# Altium PCB OFP_MCM_v1.6.3.PcbDoc (part 7 of 8)
Units mil, origin at the board's own origin, x right, y up, seen from the top; angles counter-clockwise.
Board outline 4330.71 x 4724.41 mil, 4 copper layers (Top Layer, Layer 1, Layer 2, Bottom Layer), stack 62.047 mil thick; 385 components, 287 nets, 1341 pads, 554 vias.
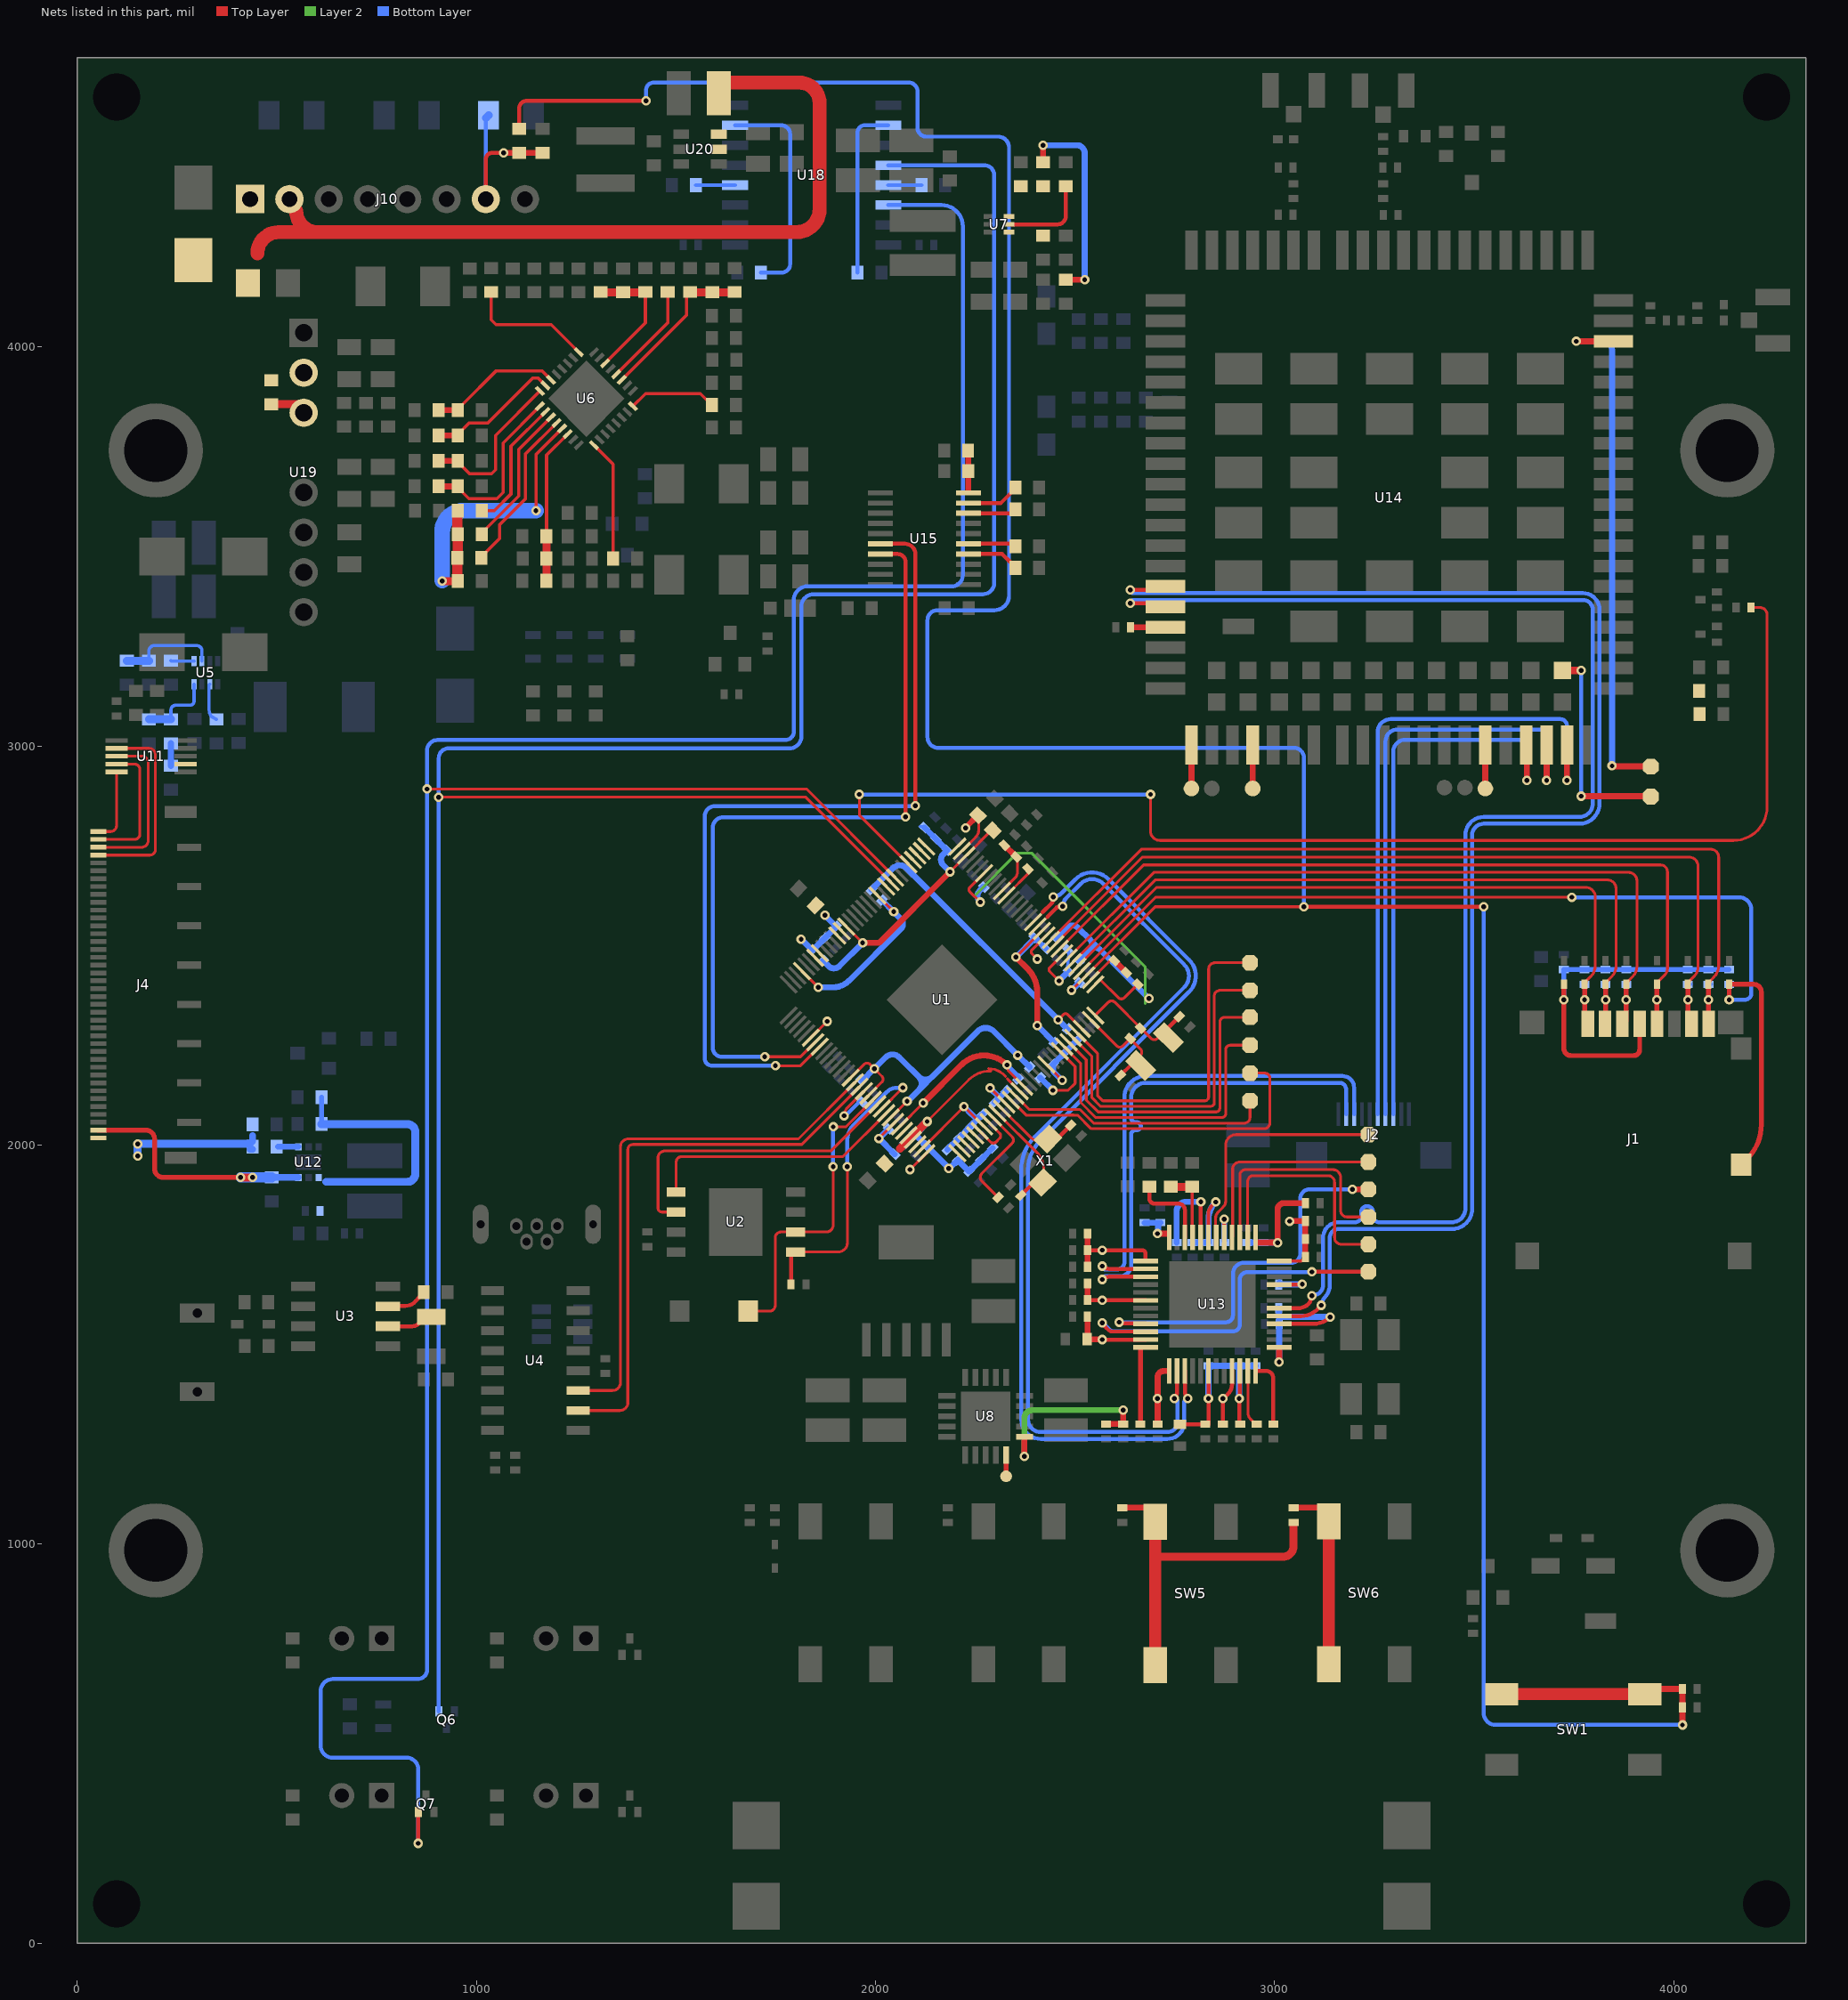
[diagram p6: the nets of this part, all layers, seen from the top]

## Via types
v1: diameter 23.62, hole 11.81, Top Layer to Bottom Layer, tented both sides, 554 vias

## Nets (pads, with @x,y where several pads share a name; then routed paths per layer and width w, separated by ;. In a path a pad name is that pad's centre, name@x,y a point inside that pad or via, vN(x,y) a via of type N, cw(c..) or ccw(c..) an arc to the next point about the centre after c; other vN are vias at no path point) (continued)
NetR15_2: R15.2 R16.2 SW5.3 SW5.4 | length 879.3
  Top Layer w10: 2701.1,984.48 2701.1,984.6
  Top Layer w15: R15.2@2618.11,1091.45 2679.07,1091.45 SW5.3@2701.1,1055.52
  Top Layer w20: 2701.1,968 3019.19,968 ccw(c3019.19,996.05) 3047.24,996.05 R16.2@3047.24,1051.82
  Top Layer w30: SW5.4@2701.1,697.26 2701.1,968 2701.1,984.48 ; 2701.1,984.6 SW5.3@2701.1,1055.52
NetR16_1: R16.1 SW6.3 SW6.4 | length 466.7
  Top Layer w15: R16.1@3047.24,1091.45 3111.3,1091.45 3135.82,1066.92 SW6.3@3135.82,1057.17
  Top Layer w30: SW6.4@3135.82,698.91 SW6.3@3135.82,1057.17
NetR20_2: R20.2 U3.3 | length 103.5
  Top Layer w10: U3.3@778.35,1595.92 803.87,1596.79 821.8,1596.79 ccw(c821.8,1631.46) 847.83,1608.55 858.04,1620.12 R20.2@868.04,1631.46
NetR39_1: R39.1 U5.6 | length 97.5
  Bottom Layer w8: U5.6@332.13,3154.42 330.44,3152.73 330.44,3097.47 330.44,3089.88 ccw(c356.95,3089.88) 335.48,3074.33 R39.1@348.98,3066.51
NetR40_2: R40.2 R43.1 U5.2 | length 253.6
  Bottom Layer w8: R43.1@179.63,3213.36 179.63,3238.1 cw(c192.83,3238.1) 192.83,3251.3 299.43,3251.3 cw(c299.43,3238.29) 312.44,3238.29 U5.2@312.44,3212.29
  Bottom Layer w20: R40.2@124.51,3213.36 R43.1@179.63,3213.36
NetR41_1: R41.1 R46.1 | length 56.5
  Bottom Layer w15: R41.1@234.74,2950 R46.1@234.74,3006.51
NetR42_1: R42.1 U6.25 | length 322.7
  Top Layer w8: R42.1@1037.22,4137.36 1037.22,4067.4 1048.9,4055.71 1187.4,4055.71 U6.25@1256.52,3986.59
NetR44_2: R44.2 R46.2 U5.8 | length 191.5
  Bottom Layer w8: R46.2@234.74,3066.51 234.74,3089.99 cw(c246.42,3089.99) 246.42,3101.67 282.21,3101.67 ccw(c282.21,3112.22) 292.76,3112.22 U5.8@292.76,3154.42
  Bottom Layer w20: R44.2@179.63,3066.51 R46.2@234.74,3066.51
NetR45_2: R45.2 U5.1 | length 58.5
  Bottom Layer w8: R45.2@234.74,3213.36 235.81,3212.29 U5.1@292.76,3212.29
NetR50_2: R50.2 U6.3 | length 364.6
  Top Layer w8: R50.2@1013.38,3530.5 1024.38,3541.5 1024.38,3544.46 1106.3,3626.39 1106.3,3742.55 U6.3@1186.92,3823.17
NetR51_2: R51.2 U6.2 | length 332.2
  Top Layer w8: R51.2@1013.38,3589.55 1045.07,3589.55 1086.61,3631.09 1086.61,3750.7 U6.2@1173,3837.09
NetR52_1: R52.1 U6.9 | length 304
  Top Layer w8: U6.9@1294.66,3753.58 1342.52,3705.72 R52.1@1342.52,3469.44
NetR55_2: R55.2 U6.4 | length 416
  Top Layer w8: R55.2@1012.38,3471.44 1012.38,3473.94 1023.38,3484.94 1023.58,3484.94 1058.63,3519.99 1058.63,3554.38 1123.12,3618.88 1123.12,3731.53 U6.4@1200.84,3809.25
NetR57_1: R57.1 U6.16 | length 223
  Top Layer w8: U6.16@1392.09,3851.01 1423.97,3882.89 1561.12,3882.89 R57.1@1589.92,3854.08
NetR58_1: R58.1 U7.4
NetR61_1: R61.1 R66.1 | length 523.7
  Top Layer w15: R66.1@2419.53,4461.94 v1(2419.53,4505) ; R61.1@2476.26,4168.04 v1@2524,4168.04
  Bottom Layer w15: v1(2419.53,4505) 2504,4505 cw(c2504,4485) 2524,4485 v1(2524,4168)
NetR62_2: R62.2 U7.5 | length 228.9
  Top Layer w10: U7.5@2334.12,4306.74 2456.57,4306.74 ccw(c2456.57,4326.42) 2476.26,4326.42 R62.2@2476.26,4401.94
NetR63_2: R63.2 R66.2 U7.6
NetR64_2: R64.2 U6.20 | length 259.9
  Top Layer w8: U6.20@1350.34,3930.91 1479.29,4059.86 R64.2@1479.29,4137.36
NetR67_1: R67.1 R68.2 U8.16 | length 477.7
  Top Layer w15: v1(2373.09,1220) U8.16@2373.09,1266.19 ; R67.1@2577.14,1301.08 R68.2@2620.14,1301.08 v1(2620.14,1335.58)
  Layer 2 w15: v1(2373.09,1220) 2373.09,1315.42 cw(c2393.25,1315.42) 2393.25,1335.58 v1(2620.14,1335.58)
NetR82_1: R82.1 R85.2 SB1.1 U12.1 | length 653.4
  Bottom Layer w12: R85.2@611.74,2052.48 SB1.1@611.74,2120
  Bottom Layer w20: R85.2@611.74,2052.48 826.79,2052.48 cw(c826.79,2032.49) 840.62,2046.92 841.23,2046.32 cw(c826.79,2032.49) 846.78,2032.49 846.78,1927 cw(c827.64,1927) 843.52,1916.31 838.33,1911.12 cw(c827.64,1927) 827.64,1907.86 623.74,1907.86
NetR84_1: R84.1 U12.4 | length 51.1
  Bottom Layer w15: R84.1@503.14,1995.63 U12.4@554.2,1995.63
NetR87_2: R87.2 U13.24 | length 203.1
  Top Layer w7: R87.2@2663,1301.08 R87.2@2664.16,1302.24 ; U13.24@2664.16,1490.38 2666.56,1492.78 U13.24@2676.46,1492.78
  Top Layer w12: R87.2@2664.16,1302.24 U13.24@2664.16,1490.38
NetR88_2: R88.2 R89.2 U13.9 | length 182.2
  Top Layer w7: R88.2@2793.18,1895.22 2793.18,1769.76 U13.9@2794.57,1768.37
  Top Layer w20: R89.2@2739.41,1895.22 R88.2@2794.19,1895.22
NetR90_2: R90.2 U13.35 | length 143.2
  Top Layer w7: U13.35@2932.37,1433.73 2933.23,1432.87 2933.23,1328.51 ccw(c2954.34,1328.51) 2939.41,1313.58 2945.98,1307.01 2945.98,1306.58 2951.48,1301.08 R90.2@2954.98,1301.08
NetR91_2: R91.2 U13.36 | length 169.4
  Top Layer w10: U13.36@2952.05,1433.73 2978.52,1433.73 cw(c2978.52,1415.66) 2996.59,1415.66 R91.2@2996.59,1301.08
NetR92_1: R92.1 U13.5 | length 99.3
  Top Layer w10: U13.5@2873.28,1768.41 v1@2873.28,1814.4
  Bottom Layer w15: R92.1@2873.23,1761.25 v1(2873.24,1814.43)
NetR94_1: R94.1 U13.8 | length 242.3
  Top Layer w10: U13.8@2814.26,1768.37 2814.6,1768.72 2814.6,1857.31 v1(2814.95,1857.65)
  Bottom Layer w15: R94.1@2754.41,1755.38 2754.41,1834.25 cw(c2777.82,1834.25) 2777.82,1857.65 v1(2814.95,1857.65)
NetR95_2: R95.2 U13.10 | length 203.2
  Top Layer w10: R95.2@2686,1895.22 2686,1866.4 ccw(c2699.4,1866.4) 2699.4,1853 2759,1853 cw(c2759,1837.11) 2774.89,1837.11 U13.10@2774.89,1768.37
NetR102_1: R102.1 R104.1 U15.10 | length 102.9
  Top Layer w15: U15.10@2232.11,3636.64 R104.1@2232.11,3688.34 R102.1@2232.11,3739.52
NetR105_2: R105.2 U15.4 | length 133.1
  Top Layer w10: U15.4@2232.67,3480.66 2317.32,3480.66 2339.46,3458.52 2340,3458.52 2350,3448.52 R105.2@2350,3446.02
NetR106_2: R106.2 U15.5 | length 117.4
  Top Layer w10: U15.5@2232.67,3506.25 2349.9,3506.25 R106.2@2350,3506.16
NetR107_2: R107.2 U15.8 | length 121.4
  Top Layer w10: U15.8@2232.67,3583.02 2340.2,3583.02 R107.2@2350,3592.82
NetR108_2: R108.2 U15.9 | length 134.7
  Top Layer w10: U15.9@2232.67,3608.61 2314.11,3608.61 2350,3644.5 R108.2@2350,3647
NetR110_2: R110.2 R111.1
NetR115_2: 
NetR123_2: R123.2 U18.7 | length 561
  Bottom Layer w10: U18.7@1648.07,4554.94 1763.45,4554.94 cw(c1763.45,4532.39) 1786,4532.39 1786,4207 cw(c1765.01,4207) 1765.01,4186.01 R123.2@1713.15,4186.01
NetR124_1: R124.1 U18.10 | length 438.2
  Bottom Layer w10: R124.1@1954.93,4186.01 1954.93,4536.95 cw(c1972.92,4536.95) 1972.92,4554.94 U18.10@2031.93,4554.94
NetR125_2: R125.2 U19.3 | length 93
  Top Layer w20: R125.2@486.21,3856.18 493.71,3856.18 553.27,3856.18 561.94,3847.51 U19.3@567.18,3834.86
NetR126_2: R126.2 U18.4 | length 98.2
  Bottom Layer w10: R126.2@1549.91,4404.94 U18.4@1648.07,4404.94
NetR127_1: R127.1 U18.13 | length 82.8
  Bottom Layer w10: U18.13@2031.93,4404.94 R127.1@2114.74,4404.94
NetTP1_1: TP1.1 U1.92 | length 899.2
  Top Layer w7: U1.92@2505.77,2280.02 2555.91,2229.88 2555.91,2124.11 2569.24,2110.78 2824.6,2110.78 ccw(c2824.6,2120.71) 2834.52,2120.71 2834.52,2440.93 cw(c2850.25,2440.93) 2850.25,2456.66 TP1.1@2938.06,2456.66
NetTP2_1: TP2.1 U1.91 | length 855.9
  Top Layer w7: U1.91@2494.63,2268.89 2541.91,2221.61 2541.91,2118.31 2563.44,2096.78 2839.89,2096.78 2844.42,2098.41 2847.66,2101.65 ccw(c2839.89,2105.41) 2848.52,2105.41 2848.52,2373.18 cw(c2862.9,2373.18) 2862.9,2387.56 TP2.1@2938.06,2387.56
NetTP3_1: TP3.1 U1.90 | length 814
  Top Layer w7: U1.90@2483.49,2257.75 2527.91,2213.34 2527.91,2112.51 2557.64,2082.78 2852.79,2082.78 ccw(c2852.79,2092.52) 2862.52,2092.52 2862.52,2307.86 cw(c2874.73,2307.86) 2874.73,2320.06 TP3.1@2938.06,2320.06
NetTP4_1: TP4.1 U1.89 | length 769.3
  Top Layer w7: U1.89@2472.36,2246.62 2472.36,2246 2513.91,2204.46 2513.91,2106.71 2551.84,2068.78 2867.29,2068.78 ccw(c2867.29,2078.68) 2877.19,2078.68 2877.19,2238.96 cw(c2888.29,2238.96) 2888.29,2250.06 TP4.1@2938.06,2250.06
NetTP5_1: TP5.1 U1.78 | length 667
  Top Layer w7: U1.78@2349.87,2124.13 2385.12,2088.88 2481.09,2088.88 2481.21,2089 2501.51,2089 2501.63,2088.88 2511.94,2088.88 2546.04,2054.78 2924.06,2054.78 ccw(c2924.06,2068.78) 2938.06,2068.78 TP5.1@2938.06,2110.78
NetTP6_1: TP6.1 U1.77 | length 856.3
  Top Layer w7: U1.77@2338.75,2113.01 2376.87,2074.88 2486.89,2074.88 2487.01,2075 2495.71,2075 2495.83,2074.88 2506.14,2074.88 2540.24,2040.78 2972.78,2040.78 ccw(c2972.78,2056) 2988,2056 2988,2167 ccw(c2974.94,2167) 2974.94,2180.06 TP6.1@2938.06,2180.06
NetTP7_1: TP7.1 U8.15 | length 53.2
  Top Layer w12: TP7.1@2327.09,1170 U8.15@2327.09,1223.23
NetTP8_1: TP8.1 U14.34 | length 1334.5
  Top Layer w15: v1(3755.66,4013.78) U14.34@3848.42,4013.78 ; v1(3845,2950) 3846.09,2948.91 3940.98,2948.91 TP8.1@3942.06,2947.83
  Bottom Layer w15: v1(3755.66,4013.78) 3823.16,4013.78 cw(c3823.16,3991.94) 3845,3991.94 v1(3845,2950)
NetTP9_1: TP9.1 U13.2 | length 608.8
  Top Layer w7: U13.2@2932.37,1768.37 2932.37,1909.45 cw(c2946.15,1909.45) 2946.15,1923.23 3133.07,1923.23 cw(c3133.07,1906.34) 3149.97,1906.34 3149.97,1768.25 ccw(c3167.13,1768.25) 3167.13,1751.09 TP9.1@3234.68,1751.09
NetTP10_1: TP10.1 U14.128 | length 536
  Top Layer w15: v1(3767.71,2873.92) 3940.99,2873.92 TP10.1@3942.06,2872.84
  Top Layer w20: U14.128@3720.47,3188.98 v1(3767.71,3188.98)
  Bottom Layer w10: v1@3767.71,2875 v1(3767.71,3188.98)
NetTP11_1: TP11.1 U13.3 | length 589.2
  Top Layer w7: U13.3@2912.68,1768.37 2912.68,1924.45 cw(c2926.46,1924.45) 2926.46,1938.23 3145.84,1938.23 cw(c3145.84,1919.11) 3164.97,1919.11 3164.97,1835.9 ccw(c3181.01,1835.9) 3181.01,1819.86 TP11.1@3234.68,1819.86
NetTP12_1: TP12.1 U13.22 | length 927.1
  Top Layer w9: v1(2567.73,1554.57) 2579.25,1540.42 ccw(c2596.64,1554.57) 2596.64,1532.15 U13.22@2676.46,1532.15
  Top Layer w10: v1@3093.07,1682.33 TP12.1@3234.68,1682.33
  Bottom Layer w10: v1@2567.73,1555.57 2585.88,1537.42 ccw(c2596.19,1547.74) 2596.19,1533.16 2895.69,1533.16 ccw(c2895.69,1549.75) 2912.29,1549.75 2912.29,1662.62 cw(c2931.02,1662.62) 2914.65,1671.73 cw(c2931.02,1662.62) 2931.02,1681.35 3092.27,1681.35 ccw(c3092.27,1682.15) v1(3093.07,1682.15)
NetTP13_1: TP13.1 U13.21 | length 986.6
  Top Layer w10: v1(2610,1555.97) 2613.69,1555.97 2616.94,1552.72 2675.58,1552.72 U13.21@2676.46,1551.84
  Top Layer w15: v1(3194.31,1888.63) TP13.1@3234.68,1888.63
  Bottom Layer w10: v1(2610,1555.97) 2878.03,1555.97 ccw(c2878.03,1573.22) 2895.29,1573.22 2895.29,1677.28 cw(c2922.85,1677.28) 2922.85,1704.84 3041.16,1704.84 ccw(c3041.16,1727.51) 3063.83,1727.51 3063.83,1865.51 cw(c3086.94,1865.51) 3086.94,1888.63 v1(3194.31,1888.63)
NetTP14_1: TP14.1 U13.4 | length 522.1
  Top Layer w7: U13.4@2893,1768.37 2894.55,1769.93 2894.55,1939.5 cw(c2912.44,1939.5) 2912.44,1957.39 TP14.1@3234.68,1957.39
NetTP15_1: TP15.1 U13.6 | length 613.3
  Top Layer w7: U13.6@2853.63,1768.37 2851.93,1770.07 2851.93,1816.46 cw(c2874.04,1816.46) 2858.4,1832.09 2870.55,1844.24 ccw(c2854.53,1860.26) 2877.19,1860.26 2877.19,2000.01 cw(c2903.33,2000.01) 2903.33,2026.16 TP15.1@3234.69,2026.16
NetU3_2: U3.2 X3.2 | length 115.1
  Top Layer w10: U3.2@778.35,1545.92 839.4,1545.92 ccw(c839.4,1569.53) 857.89,1554.84 X3.2@887.21,1569.53
NRST: D19.1 J10.7 R118.1 R119.1 | length 463.7
  Top Layer w10: J10.7@1023.62,4370.08 1023.62,4469.62 cw(c1040,4469.62) 1040,4486 v1(1068.44,4486)
  Top Layer w15: v1(1068.44,4486) R119.1@1107.25,4486 R118.1@1165.68,4486
  Bottom Layer w10: J10.7@1023.62,4370.08 D19.1@1023.62,4573.15
  Bottom Layer w20: D19.1@1023.62,4573.15 D19.1@1030.47,4580
PCA0: 
PCA1: 
PCA2: 
PCA3: 
PCA4: 
PCA5: 
PCA6: 
PCA7: 
PE20: U1.10
PENIRQ: U11.7
PG0: R117.2 U1.5 | length 3186.4
  Top Layer w7: v1(1959.44,2878.39) 1959.44,2826.35 U1.5@2082.63,2703.16 ; v1(2688.97,2878.39) 2688.97,2786.33 ccw(c2712.3,2786.33) 2712.36,2763 4149.58,2763 ccw(c4149.58,2846.83) 4233.42,2846.83 4233.42,3328.92 ccw(c4215.77,3328.92) 4215.77,3346.56 R117.2@4192.67,3346.56
  Bottom Layer w10: v1(1959.44,2878.39) v1(2688.97,2878.39)
PG1: U1.4
PG2: U1.3
PG3: U1.2
PG5: U1.128
RTC_VIO: C25.2 U1.97 | length 146.1
  Top Layer w7: U1.97@2550.32,2402.49 2562.18,2414.36 2562.8,2414.36 2607.88,2369.28 2607.93,2369.23 ccw(c2615.73,2377.03) 2623.54,2369.26 C25.2@2657.15,2402.86
SDC0-CLK0: D2.2 J1.5 U1.105 | length 2010.5
  Top Layer w7: U1.105@2461.22,2491.59 2671.37,2701.74 3966.26,2701.74 cw(c3966.26,2684.11) 3983.89,2684.11 3983.89,2442.16 cw(c3961.26,2442.16) 3977.27,2426.17 3957.58,2406.47 D2.2@3957.58,2402.53
  Top Layer w12: J1.5@3957.58,2303.35 v1(3957.58,2364.12) D2.2@3957.58,2402.53
SDC0-CMD: D3.2 J1.3 R2.1 U1.103 | length 1935.4
  Top Layer w7: U1.103@2483.49,2469.32 2697.24,2683.06 3885.92,2683.06 cw(c3885.92,2661.73) 3907.25,2661.73 3907.25,2446.8 cw(c3872.84,2446.8) 3897.18,2422.47 3881.18,2406.47 D3.2@3881.18,2402.53 D3.2@3880.18,2401.53 ; J1.3@3870.96,2303.35 J1.3@3880.18,2312.56
  Top Layer w12: J1.3@3880.18,2312.56 v1(3880.18,2364.12) D3.2@3880.18,2401.53
  Bottom Layer w8: R2.1@3880.18,2401.71 R2.1@3881.18,2402.71
  Bottom Layer w10: v1(3880.18,2364.12) R2.1@3880.18,2401.71
SDC0-D0: D4.2 J1.7 R3.1 U1.106 | length 2166
  Top Layer w7: U1.106@2450.09,2502.72 2668.79,2721.42 4037.58,2721.42 cw(c4037.58,2698.5) 4060.5,2698.5 4060.5,2447.1 cw(c4026.44,2447.1) 4050.52,2423.01 4033.98,2406.47 4033.98,2402.53 D4.2@4035.13,2401.39 ; J1.7@4035.13,2312.41 J1.7@4044.19,2303.35
  Top Layer w12: J1.7@4035.13,2312.41 v1(4035.13,2364.12) D4.2@4035.13,2401.39
  Bottom Layer w8: R3.1@4035.13,2397.71 4040.13,2402.71 R3.1@4042.52,2402.71
  Bottom Layer w10: v1(4035.13,2364.12) R3.1@4035.13,2397.71
SDC0-D1: D5.2 J1.8 R4.1 U1.107 | length 2249.4
  Top Layer w7: U1.107@2438.95,2513.86 2666.19,2741.11 4091.89,2741.11 cw(c4091.89,2720.73) 4112.27,2720.73 4112.27,2450.53 cw(c4068.2,2450.53) 4099.38,2419.4 ; J1.8@4086.45,2304.39 J1.8@4087.5,2303.35 ; D5.2@4086.45,2402.53 4086.45,2406.47 4099.36,2419.38
  Top Layer w12: J1.8@4086.45,2304.39 v1(4086.45,2364.12) D5.2@4086.45,2402.53
  Bottom Layer w8: R4.1@4086.45,2397.71 4091.45,2402.71 R4.1@4094.5,2402.71
  Bottom Layer w10: v1(4086.45,2364.12) R4.1@4086.45,2397.71
SDC0-D2: D6.2 J1.1 R5.1 U1.101 | length 1762.9
  Top Layer w7: U1.101@2505.77,2447.04 2704.43,2645.7 3779.25,2645.7 cw(c3779.25,2622.21) 3802.75,2622.21 3802.75,2447.86 cw(c3766.99,2447.86) 3792.27,2422.58 3780.15,2410.46 3780.15,2406.41 D6.2@3776.27,2402.53 ; J1.1@3776.27,2311.42 J1.1@3784.35,2303.35
  Top Layer w12: J1.1@3776.27,2311.42 v1(3776.27,2364.12) D6.2@3776.27,2402.53
  Bottom Layer w10: v1(3776.27,2364.12) R5.1@3776.27,2402.71
SDC0-D3: D7.2 J1.2 R6.1 U1.102 | length 1842
  Top Layer w7: U1.102@2494.63,2458.18 2700.63,2664.18 3833.17,2664.18 cw(c3833.17,2642.36) 3854.99,2642.36 3854.99,2447.26 cw(c3819.94,2447.26) 3844.72,2422.47 D7.2@3828.72,2406.47 ; J1.2@3827.66,2303.35 J1.2@3829.72,2305.42
  Top Layer w12: J1.2@3828.72,2305.42 v1(3828.72,2364.12) D7.2@3828.72,2402.53
  Bottom Layer w10: v1(3828.72,2364.12) R6.1@3828.72,2402.71
SDC0-DET: D8.2 J1.SN R7.1 U1.100 | length 2667.9
  Top Layer w7: U1.100@2516.9,2435.91 2701.74,2620.75 2740.16,2620.75 v1(3744,2620.75)
  Top Layer w12: v1(4138.46,2364.12) D8.2@4138.46,2402.53 4199.77,2402.53 cw(c4199.77,2383.32) 4218.99,2383.32 4218.99,2050.46 cw(c4100.02,2050.46) 4190.3,1972.97 J1.SN@4168.4,1950.59
  Bottom Layer w10: v1(3744,2620.75) 4163.25,2620.75 cw(c4163.25,2590) 4194,2590 4194,2380.12 cw(c4178,2380.12) 4178,2364.12 v1(4138.46,2364.12) 4138.46,2397.71 4143.46,2402.71 R7.1@4146.5,2402.71
SPI-CLK: U1.53 U2.6 | length 785
  Top Layer w7: U2.6@1500.59,1832.09 1464.85,1832.09 cw(c1464.85,1841.95) 1454.99,1841.95 1454.99,1967.85 cw(c1472.14,1967.85) 1472.14,1985 1887.84,1985 U1.53@2004.69,2101.85
SPI-CS: R10.1 U1.54 U2.1 | length 766.1
  Top Layer w7: U2.1@1799.8,1732.09 1906.52,1732.09 ccw(c1906.52,1754.76) 1929.2,1754.76 v1(1929.2,1945.45) ; U1.54@2015.81,2090.73 v1(2068.69,2143.61)
  Top Layer w10: R10.1@1788.42,1650.8 1788.42,1725.28 1795.23,1732.09 U2.1@1799.8,1732.09
  Bottom Layer w10: v1(1929.2,1945.45) 1929.2,2013.25 cw(c1978.79,2013.25) 1943.7,2048.31 2028.51,2133.12 cw(c2053.85,2107.78) 2053.85,2143.61 v1(2068.69,2143.61)
SPI-MISO: SW2.1 U1.52 U2.2 | length 787
  Top Layer w7: SW2.1@1681.08,1583.75 1734.6,1583.75 ccw(c1734.6,1597.7) 1748.55,1597.7 1748.55,1767.69 cw(c1762.95,1767.69) 1762.95,1782.09 U2.2@1799.79,1782.09 1876.78,1782.09 ccw(c1876.78,1799.01) 1893.7,1799.01 v1(1893.7,1945.45) v1@1893.7,1951.45 ; v1@1895.6,2045.72 1926.26,2045.72 U1.52@1993.54,2113.01
  Bottom Layer w10: v1(1893.7,1945.45) v1@1893.7,2045.72
  other v1: 1894.01,2045.72
SPI-MOSI: U1.55 U2.5 | length 654.4
  Top Layer w7: U2.5@1500.59,1882.09 1500.59,1957.29 cw(c1514.3,1957.29) 1514.3,1971 1918.37,1971 U1.55@2026.96,2079.59
SVREF: C14.2 C15.2 R27.1 R29.2 U1.63 U1.71 | length 371.8
  Top Layer w7: U1.63@2116.05,1990.5 v1@2220.49,2094.95 ; v1@2222.95,2095.16 U1.71@2271.93,2046.18
  Bottom Layer w15: R27.1@2179.76,1988.4 R29.2@2209.32,2017.96 C14.2@2238.88,2047.52 ; 2231.05,2087.06 2254.24,2063.87 ; C14.2@2242.88,2052.52 2251.88,2061.52 ; 2250.24,2058.87 C15.2@2268.44,2077.08
  other v1: 2221.49,2095.95
SZQ: R30.2 U1.73 | length 271.5
  Top Layer w7: U1.73@2294.2,2068.46 2312.61,2050.05 2341.65,2021.01 cw(c2333.1,2012.46) 2341.65,2003.91 2266.13,1928.39 ccw(c2275.45,1919.06) 2266.12,1909.74 R30.2@2307.07,1868.79
TPS_EN1: R70.1 R74.2 U6.31 | length 336.4
  Top Layer w8: R74.2@953.38,3777.77 953.38,3780.27 982.46,3809.36 1029.27,3809.36 1141.18,3921.26 1154.81,3921.26 U6.31@1173,3903.07
  Top Layer w15: R70.1@905.01,3777.77 R74.2@953.38,3777.77
TPS_EN2: R71.1 R75.2 U6.32 | length 404.9
  Top Layer w8: R75.2@953.38,3714.03 953.38,3711.53 982.72,3682.19 1038.19,3682.19 1047.84,3691.84 1047.84,3777.91 U6.32@1159.08,3889.15
  Top Layer w15: R71.1@905.01,3714.03 R75.2@953.38,3714.03
TPS_EN3: R72.1 R76.2 U6.1 | length 436.6
  Top Layer w8: R76.2@953.38,3650.29 953.38,3647.79 981.43,3619.74 1051.74,3619.74 1066.93,3634.93 1066.93,3758.85 U6.1@1159.08,3851.01
  Top Layer w15: R72.1@905.01,3650.29 R76.2@953.38,3650.29
TPS_FB1: C55.2 R47.2 R48.1 U6.22 | length 328
  Top Layer w8: U6.22@1322.5,3958.75 1423.35,4059.6 R47.2@1423.35,4137.36
  Top Layer w15: R47.2@1408.24,4136.36 R47.2@1419.07,4136.36
  Top Layer w20: R48.1@1311.48,4136.36 C55.2@1367.42,4136.36 R47.2@1408.24,4136.36
TPS_FB2: C66.2 R53.2 R54.1 U6.6 | length 401.8
  Top Layer w8: R54.1@1175.73,3513.23 1175.73,3728.46 U6.6@1228.68,3781.41
  Top Layer w20: C66.2@1175.34,3413.58 R54.1@1175.35,3525.23
TPS_FB3: C73.2 R59.1 R60.1 U6.19 | length 390
  Top Layer w8: U6.19@1364.26,3916.99 1526.66,4079.4 1526.66,4128.79 R60.1@1535.23,4137.36
  Top Layer w20: R60.1@1543.23,4136.36 C73.2@1591.17,4136.36 R59.1@1642,4136.36
TPS_VDIV: R69.1 R73.2 U6.30 | length 332.9
  Top Layer w8: R73.2@953.38,3841.51 953.38,3844.01 964.38,3855.01 964.67,3855.01 1048.64,3938.98 1164.93,3938.98 U6.30@1186.92,3916.99
  Top Layer w15: R69.1@905.01,3841.51 R73.2@953.38,3841.51
TS_XN: J4.39 U11.4 | length 339.6
  Top Layer w7: J4.39@52.95,2765.75 143.91,2765.75 ccw(c143.91,2778.66) 156.82,2778.66 156.82,2940.74 ccw(c143.05,2940.74) 143.05,2954.51 U11.4@98.46,2954.51
TS_XP: J4.37 U11.2 | length 494.9
  Top Layer w7: J4.37@52.95,2726.38 182.35,2726.38 ccw(c182.35,2739.73) 195.7,2739.73 195.7,2977.93 ccw(c179.75,2977.93) 179.75,2993.88 U11.2@98.46,2993.88
TS_YN: J4.40 U11.5 | length 188.6
  Top Layer w7: J4.40@52.95,2785.43 83.88,2785.43 ccw(c83.88,2800) 98.46,2800 U11.5@98.46,2934.82
TS_YP: J4.38 U11.3 | length 418.7
  Top Layer w7: J4.38@52.95,2746.06 161.71,2746.07 ccw(c161.71,2762.06) 177.69,2762.06 177.69,2958.91 ccw(c162.41,2958.91) 162.41,2974.19 U11.3@98.46,2974.19
UART0_RX: U1.49 U4.2 | length 1418.1
  Top Layer w7: U4.2@1254.85,1334.82 1359.54,1334.82 ccw(c1359.54,1354.69) 1379.4,1354.69 1379.4,1988.97 cw(c1391.83,1988.97) 1391.83,2001.39 1815.13,2001.39 U1.49@1960.14,2146.4
UART0_TX: U1.48 U4.3 | length 1366.6
  Top Layer w7: U4.3@1254.85,1384.82 1340.93,1384.82 ccw(c1340.93,1405.17) 1361.27,1405.17 1361.27,1996.18 cw(c1380.49,1996.18) 1380.49,2015.39 1806.87,2015.39 U1.48@1949.01,2157.53
UART1_RX: Q7.2 U1.8 U18.14 | length 7373.9
  Top Layer w7: v1@871.6,2892.02 1826.97,2892.02 U1.8@2049.23,2669.75
  Top Layer w10: Q7.2@854.22,328.83 Q7.2@854.32,328.74 854.32,250.49 v1(854.42,250.4)
  Bottom Layer w10: v1(854.42,250.4) 854.42,435.58 ccw(c825,435.58) 825,465 640,465 cw(c640,495) 610,495 610,631.67 cw(c640.33,631.67) 640.33,662 853.2,662 ccw(c853.2,685.4) 876.6,685.4 v1(876.6,2892.02) 876.6,2988.74 cw(c902.55,2988.74) 902.55,3014.69 1774.08,3014.69 ccw(c1774.08,3035.7) 1795.09,3035.7 1795.09,3364.77 cw(c1830.1,3364.77) 1830.1,3399.78 2190.79,3399.78 ccw(c2190.79,3427.62) 2218.63,3427.62 2218.63,4301.51 ccw(c2165.2,4301.51) 2165.2,4354.94 U18.14@2031.93,4354.94
UART1_TX: Q6.2 U1.9 U18.12 | length 6692.1
  Top Layer w7: v1(905.65,2871.5) 1825.2,2871.5 U1.9@2038.09,2658.61
  Bottom Layer w10: Q6.2@905.65,580.67 v1(905.65,2871.5) 905.65,2968.84 cw(c930.48,2968.84) 930.48,2993.66 1783.96,2993.66 ccw(c1783.96,3023.92) 1814.22,3023.92 1814.22,3349.36 cw(c1844.85,3349.36) 1844.85,3380 2269.37,3380 ccw(c2269.37,3407.67) 2297.04,3407.67 2297.04,4430.14 ccw(c2272.24,4430.14) 2272.24,4454.94 U18.12@2031.93,4454.94
UART2_RX: U1.40 U15.16 | length 2198.8
  Top Layer w7: v1(1749.15,2198.61) 1811.91,2198.61 U1.40@1859.92,2246.62
  Top Layer w10: U15.16@2012.2,3506.25 2074.05,3506.25 cw(c2074.05,3480.66) 2099.64,3480.66 v1(2099.64,2849.88)
  Bottom Layer w10: v1(1749.15,2198.61) 1590.16,2198.61 cw(c1590.16,2216.87) 1571.9,2216.87 1571.9,2823.43 cw(c1597.23,2823.43) 1597.23,2848.77 v1@2098.53,2848.77
UART2_TX: U1.39 U15.17 | length 2045.9
  Top Layer w7: v1(1722.37,2221.16) 1812.21,2221.16 U1.39@1848.79,2257.75
  Top Layer w10: U15.17@2012.2,3480.66 2055.38,3480.66 cw(c2055.38,3460.7) 2075.34,3460.7 v1(2075.34,2822.33)
  Bottom Layer w10: v1(1722.37,2221.16) 1614.84,2221.16 cw(c1614.84,2244) 1592,2244 1592,2794.63 cw(c1618.6,2794.63) 1618.6,2821.23 v1@2074.24,2821.23
USB-D_N: U1.110 U13.27 | length 2377.3
  Top Layer w10: 2430.37,2571.2 2453.34,2594.16 cw(c2460.42,2587.11) 2459.44,2597.06 v1(2468.92,2598) ; U13.27@2774.89,1433.73 2774.89,1381.82 ccw(c2798.68,1381.82) v1(2781.86,1365)
  Bottom Layer w10: v1(2468.92,2598) ccw(c2462.63,2604.29) 2471.53,2604.29 cw(c2491.01,2604.29) 2477.23,2618.06 2513.22,2654.05 ; 2513.24,2654.07 2513.31,2654.14 cw(c2542.29,2625.15) 2571.33,2654.09 ; 2571.34,2654.08 2773.59,2451.82 cw(c2745.69,2423.79) 2773.66,2395.82 2398.55,2020 ccw(c2417.67,2000.93) 2398.2,2019.63 2395.74,2017.07 ccw(c2415.22,1998.38) 2395.31,2016.61 ccw(c2479.76,1938.91) 2365,1938.91 2365,1312.3 ccw(c2413.59,1312.3) 2413.59,1263.71 2731.21,1263.71 ccw(c2731.21,1306.04) 2773.54,1306.04 2773.54,1356.69 cw(c2781.86,1356.69) v1(2781.86,1365)
USB-D_P: U1.111 U13.26 | length 2364
  Top Layer w10: 2418.35,2583.22 2441.31,2606.18 ; 2441.33,2606.2 ccw(c2434.26,2613.27) 2444.21,2612.29 v1(2445.15,2621.77) ; v1(2748.23,1365) ccw(c2731.41,1381.82) 2755.2,1381.82 U13.26@2755.2,1433.73
  Bottom Layer w10: v1(2445.15,2621.77) cw(c2451.44,2615.48) 2451.44,2624.38 ccw(c2451.44,2643.85) 2465.21,2630.08 2501.2,2666.07 2501.29,2666.16 cw(c2542.29,2625.15) 2583.3,2666.15 2583.35,2666.11 2785.64,2463.82 cw(c2745.69,2423.79) 2785.68,2383.8 2410.59,2007.99 ccw(c2417.67,2000.93) 2410.47,2007.87 2408.01,2005.3 ccw(c2415.22,1998.38) 2407.84,2005.12 ccw(c2479.76,1938.91) 2382,1938.91 2382,1312.3 ccw(c2413.59,1312.3) 2413.59,1280.71 2438.57,1280.71 2604.59,1280.71 2731.21,1280.71 ccw(c2731.21,1306.04) 2756.54,1306.04 2756.54,1356.69 ccw(c2748.23,1356.69) v1(2748.23,1365)
USB-GSM-D_N: U13.42 U14.70 | length 3769.6
  Top Layer w10: v1(2638.5,3357.21) 2717.6,3357.21 cw(c2717.6,3348.43) U14.70@2726.38,3348.43 ; U13.42@3011.11,1591.21 3058.58,1591.21 ccw(c3058.58,1628.24) 3084.76,1602.05 ccw(c3070.99,1615.83) 3090.47,1615.83 cw(c3099.36,1615.83) v1(3093.07,1622.12)
  Bottom Layer w10: v1(2638.5,3357.21) cw(c2646.81,3357.21) 2646.81,3365.52 3772.54,3365.52 cw(c3772.54,3341.43) 3796.63,3341.43 3796.63,2853.04 cw(c3786.63,2853.08) 3796.47,2851.33 3796.12,2849.32 cw(c3763.5,2855.13) 3769.31,2822.51 3767.3,2822.15 cw(c3765.55,2832) 3765.59,2822 3523.22,2822 ccw(c3523.22,2776.32) 3477.54,2776.32 3477.54,1838.06 cw(c3467.54,1838.1) 3477.39,1836.36 3477.03,1834.33 cw(c3443.95,1840.17) 3449.79,1807.09 3447.76,1806.73 cw(c3446.02,1816.57) 3446.06,1806.57 3301.9,1806.57 3261.44,1806.57 cw(c3261.44,1821.57) 3246.44,1821.57 3246.44,1832.06 ccw(c3231.44,1832.06) 3216.44,1832.06 3216.44,1821.57 cw(c3201.44,1821.57) 3201.44,1806.57 3196.44,1806.57 3160.26,1806.57 ccw(c3160.26,1767.28) 3120.96,1767.28 3120.96,1684.17 ccw(c3137.96,1684.17) 3121,1682.97 cw(c3111.03,1682.25) 3121.03,1682.25 3121.03,1649.48 cw(c3094.08,1649.48) 3113.14,1630.43 cw(c3099.36,1644.2) 3099.36,1624.72 ccw(c3099.36,1615.83) v1(3093.07,1622.12)
USB-GSM-D_P: U13.41 U14.69 | length 3770
  Top Layer w10: v1(2638.5,3390.83) 2717.6,3390.83 ccw(c2717.6,3399.61) U14.69@2726.38,3399.61 ; U13.41@3011.11,1571.52 3066.44,1571.52 ccw(c3066.44,1628.46) 3106.7,1588.2 v1(3116.85,1598.34)
  Bottom Layer w10: v1(2638.5,3390.83) ccw(c2646.81,3390.83) 2646.81,3382.52 3772.54,3382.52 cw(c3772.54,3341.43) 3813.63,3341.43 3813.63,2853.02 cw(c3786.63,2853.08) 3813.21,2848.35 3812.85,2846.34 cw(c3763.5,2855.13) 3772.29,2805.78 3770.28,2805.42 cw(c3765.55,2832) 3765.63,2805 3523.22,2805 ccw(c3523.22,2776.32) 3494.54,2776.32 3494.54,1838.04 cw(c3467.54,1838.1) 3494.13,1833.41 3493.77,1831.37 cw(c3443.95,1840.17) 3452.75,1790.35 3450.71,1789.99 cw(c3446.02,1816.57) 3446.1,1789.57 3160.26,1789.57 ccw(c3160.26,1767.28) 3137.96,1767.28 3137.96,1715.36 ; v1(3116.85,1598.34) ccw(c3110.55,1604.64) 3119.45,1604.64 cw(c3138.93,1604.64) 3125.16,1618.41 ; 3125.19,1618.44 ccw(c3094.18,1649.44) 3138.03,1649.44 3138.03,1715.36
USB-ID: U1.1
USB-PD-D_N: J2.2 U13.15 | length 1285.6
  Top Layer w10: v1(2567.73,1662.98) cw(c2584.56,1646.16) 2584.56,1669.95 U13.15@2676.46,1669.95
  Bottom Layer w10: v1(2567.73,1662.98) cw(c2576.04,1662.98) 2576.04,1671.29 2611.95,1671.29 ccw(c2611.95,1699.73) 2640.39,1699.73 2640.39,2002.23 2640.39,2027.23 cw(c2650.39,2027.23) 2650.39,2037.23 2654.43,2037.23 ccw(c2654.43,2047.23) 2654.43,2057.23 2650.39,2057.23 cw(c2650.39,2067.23) 2640.39,2067.23 2640.39,2110.78 2640.39,2117.92 ; 2640.37,2117.92 cw(c2676.7,2119.37) 2676.69,2155.73 2676.83,2155.73 3162.05,2155.73 cw(c3162.05,2138.67) 3179.1,2138.67 J2.2@3179.1,2077.07
USB-PD-D_P: J2.3 U13.14 | length 1283.4
  Top Layer w10: v1(2567.73,1696.6) ccw(c2584.56,1713.43) 2584.56,1689.63 U13.14@2676.46,1689.63
  Bottom Layer w10: v1(2567.73,1696.6) ccw(c2576.04,1696.6) 2576.04,1688.29 2604.91,1688.29 ccw(c2604.91,1706.77) 2623.39,1706.77 2623.39,2117.23 cw(c2676.7,2119.37) 2676.69,2172.73 2676.81,2172.73 3170.11,2172.73 cw(c3170.11,2144.05) 3198.79,2144.05 J2.3@3198.79,2077.07
USB_VBUS: R96.1 U14.71 | length 87.9
  Top Layer w15: R96.1@2638.5,3297.25 U14.71@2726.38,3297.25
USIM_CLK: J2.7 U14.16 | length 1565
  Top Layer w15: v1(3681.1,2913.39) U14.16@3681.1,3001.97
  Bottom Layer w10: J2.7@3277.53,2077.07 3277.53,3011.39 cw(c3307.09,3011.39) 3307.09,3040.95 3667.43,3040.95 cw(c3667.43,3027.28) 3681.1,3027.28 v1(3681.1,2913.39)
USIM_DATA: J2.8 U14.15 | length 1446
  Top Layer w10: U14.15@3629.92,3001.97 U14.15@3631.89,3000
  Top Layer w15: v1(3631.89,2913.39) U14.15@3631.89,3000
  Bottom Layer w10: J2.8@3297.21,2077.07 3297.21,2986.3 cw(c3325.92,2986.3) 3325.92,3015 3619.57,3015 cw(c3619.57,3002.68) 3631.89,3002.68 v1(3631.89,2913.39)
USIM_PRE: pad.2@3527.56,2893.39 U14.13 | length 108.6
  Top Layer w15: pad.2@3527.56,2893.39 U14.13@3527.56,3001.97
USIM_RST: J2.6 U14.17 | length 1685.5
  Top Layer w15: v1(3732.28,2913.39) U14.17@3732.28,3001.97
  Bottom Layer w10: J2.6@3257.84,2077.07 3257.84,3034.56 cw(c3290.29,3034.56) 3290.29,3067 3715.54,3067 cw(c3715.54,3050.26) 3732.28,3050.26 v1(3732.28,2913.39)
V3S_RST: C3.2 C32.2 R1.1 R119.2 SW1.1 SW1.2 U1.99 | length 8662.4
  Top Layer w7: v1(2491.16,2387.89) U1.99@2528.04,2424.77 2700.27,2597 v1(3072.81,2597)
  Top Layer w10: R119.2@1107.25,4546 1107.25,4597.04 cw(c1126.54,4597.04) 1126.54,4616.32 v1(1424.71,4616.32) ; v1(3072.81,2597) v1(3523.62,2597)
  Top Layer w15: SW1.2@3940.16,637.02 R1.1@4021.5,637.02 C3.2@4021.5,591.15 v1(4021.5,547)
  Top Layer w30: SW1.1@3568.9,624.02 SW1.2@3927.16,624.02
  Bottom Layer w7: C32.2@2510.45,2407.18 C32.2@2511.54,2407.18
  Bottom Layer w10: v1(1424.71,4616.32) 1424.71,4641.82 cw(c1445,4641.82) 1445,4662.1 2082.9,4662.1 cw(c2082.9,4640) 2105,4640 2105,4548.81 ccw(c2127.34,4548.81) 2127.34,4526.47 2307.44,4526.47 cw(c2307.44,4499.59) 2334.31,4499.59 2334.31,3376.32 cw(c2298,3376.32) 2298,3340 2155,3340 ccw(c2155,3315) 2130,3315 2130,3022.25 ccw(c2157.25,3022.25) 2157.25,2995 2185,2995 3048.71,2995 cw(c3048.71,2970.9) 3072.81,2970.9 v1@3072.81,2606.3 ; v1(3523.62,2597) 3523.62,660.25 3523.62,576.99 ccw(c3554.05,576.99) 3540,550 ccw(c3552.26,573.55) 3552.26,547 ; 3552.3,547 v1(4021.5,547)
  Bottom Layer w15: v1(2491.16,2387.89) C32.2@2510.45,2407.18
V7V: C64.2 R50.1 R51.1 R55.1 U6.5 | length 831.7
  Top Layer w8: v1(1149.16,3589.24) 1149.16,3729.74 U6.5@1214.76,3795.33
  Top Layer w20: v1@914.3,3413.06 C64.2@953.38,3413.06
  Top Layer w25: C64.2@952.38,3414.06 R55.1@952.38,3471.44 ; R50.1@952.38,3531.5 R51.1@952.38,3588.55 ; R55.1@953.38,3471.44 R50.1@953.38,3530.5
  Bottom Layer w40: v1@914.3,3415.05 914.3,3535.16 cw(c968.38,3535.16) 968.38,3589.24 v1(1149.16,3589.24)
  other v1: 914.3,3413.39
VCC-DRAM: C16.2 C17.2 C18.2 C45.2 C46.2 R27.2 R38.2 U1.59 U1.60 U1.61 U1.62 U1.65 U1.66 U1.67 U1.68 U1.69 U1.70 U1.72 U1.79 | length 831.1
  Top Layer w7: v1(2129.3,2059.01) 2232.98,2162.69 cw(c2287.94,2107.78) 2287.96,2185.47 ; U1.70@2260.79,2035.05 2268.84,2026.99 2279.19,2016.64 2288.61,2007.23 ccw(c2294.9,2013.51) 2301.19,2007.23 2310.92,2016.96 ccw(c2304.73,2023.21) 2310.95,2029.42 2301.46,2038.91 U1.72@2283.06,2057.31 ; 2282.96,2191.47 cw(c2282.94,2135.26) 2325.43,2172.05 ; 2330.43,2166.05 2331.75,2164.52 U1.79@2361.01,2135.27
  Top Layer w20: 2061.22,1990.92 2088.42,2018.13 v1(2129.3,2059.01)
  Bottom Layer w7: C45.2@2093.75,2031.87 C45.2@2093.91,2031.87 ; R27.2@2205.93,1962.24 R27.2@2206.01,1962.24
  Bottom Layer w15: C45.2@2095.91,2029.87 v1@2183.94,1941.84 ; v1@2184.97,1941.28 R27.2@2205.86,1962.17 ; R27.2@2206.01,1962.24 R38.2@2234.16,1934.08 ; R38.2@2234.73,1934.12 C18.2@2263.93,1963.32 ; C18.2@2263.88,1963.37 C17.2@2293.17,1992.65
  Bottom Layer w20: C45.2@2101.53,2030.87 v1@2128.66,2058.01
  other v1: 2182.97,1941.28
VCC-HP: C31.2 R22.2 R23.1 U1.122 | length 1237.9
  Top Layer w7: v1(2262.32,2608.73) 2235.93,2635.12 cw(c2240.81,2640) 2235.92,2644.88 U1.122@2271.93,2680.88
  Layer 2 w7: 2247.32,2623.73 2355.07,2731.48 2390.73,2731.48 2675.32,2446.88 2675.32,2354.53
  Bottom Layer w7: C31.2@2270.99,2647.4 C31.2@2271.32,2647.4
  Bottom Layer w15: v1@2260.84,2610.88 cw(c2274.03,2624.06) 2260.84,2637.25 C31.2@2270.99,2647.4 ; R23.1@2453.03,2518.02 2479.24,2544.23 cw(c2493.38,2530.1) 2507.52,2544.23 ; 2507.54,2544.21 2538.05,2513.7 ; R22.2@2509.65,2461.57 2537.7,2489.62 ; 2537.7,2514.05 cw(c2525.49,2501.83) 2537.7,2489.62 ; 2539.63,2512.12 v1@2685.55,2366.2 ; 2562.13,2489.62 ccw(c2549.92,2477.41) 2537.7,2489.62
  other v1: 2685.32,2366.97
VCC-IO: C41.2 C42.2 C43.2 C44.2 R21.2 R22.1 U1.50 U1.57 U1.104 U1.127 | length 616.7
  Top Layer w7: v1(1921.54,2073.25) cw(c1951.17,2073.25) 1930.22,2094.2 U1.50@1971.28,2135.27 ; v1(2008.35,2016.43) U1.57@2049.23,2057.31 ; U1.127@2216.24,2736.57 2250.67,2771 ccw(c2232.41,2789.3) 2258.26,2789.3 2258.26,2807.94 2256.46,2809.74 C41.2@2256.46,2826 ; v1(2459.76,2411.29) 2436.36,2434.69 cw(c2441.24,2439.57) 2436.36,2444.44 U1.104@2472.36,2480.45
  Top Layer w15: v1(2225.72,2793.96) 2225.72,2795.3 C41.2@2256.46,2826
  Bottom Layer w8: C43.2@2481.41,2489.46 C43.2@2481.58,2489.46 2484.06,2479.2 2481.01,2445.66 R22.1@2483.49,2435.41
  Bottom Layer w10: v1@1922.93,2071.85 1959.72,2108.64 1965.37,2108.64 C42.2@1966.85,2107.16
  Bottom Layer w15: C44.2@2030.72,2038.8 v1(2008.35,2016.43) R21.2@2047.8,1976.98 ; v1@2462.82,2414.74 R22.1@2483.49,2435.41
VCC-MCSI: C28.2 R24.2 R25.1 U1.85 | length 192.2
  Top Layer w7: U1.85@2427.82,2202.08 2446.23,2183.68 2467.75,2162.15 v1(2467.75,2161.78)
  Bottom Layer w15: C28.2@2445.34,2202.64 2442.86,2200.17 2442.86,2198.05 2445.34,2195.57 2445.34,2184.19 v1@2467.41,2162.12 ; C28.2@2448.48,2205.5 R24.2@2474.04,2231.06 ; R24.2@2473.89,2231.2 R25.1@2507.45,2264.76
VCC-PHY: R25.2 R26.1 U1.93 | length 764.8
  Top Layer w7: v1(2457.75,2313.77) 2471.15,2327.16 cw(c2476.03,2322.28) 2480.9,2327.16 U1.93@2516.9,2291.16
  Bottom Layer w15: R26.1@1989.92,2639.88 2043.69,2693.65 cw(c2060.78,2676.57) 2077.86,2693.66 2077.91,2693.61 v1(2457.75,2313.77) 2477.05,2294.47 R25.2@2481.29,2290.93
VCC-PLL: C30.2 R33.2 U1.76 | length 131.1
  Top Layer w7: v1(2286.72,2142.73) U1.76@2327.6,2101.85
  Bottom Layer w15: v1(2286.72,2142.73) 2309.75,2119.7 2309.75,2119.38 ; C30.2@2298.75,2107.38 R33.2@2327.31,2135.94
VCC-RTC: C29.2 R28.2 U1.98 | length 117.2
  Top Layer w7: U1.98@2539.18,2413.63 2591.93,2466.38 R28.2@2592.26,2466.38 ; R28.2@2598.35,2462.01 R28.2@2598.35,2462.1 ; C29.2@2628.09,2432.17 C29.2@2628.09,2432.27
  Top Layer w15: R28.2@2598.35,2462.01 C29.2@2628.09,2432.27
VCC-USB: C27.2 R23.2 R24.1 U1.109 | length 452.4
  Top Layer w7: v1(2351.58,2470.78) 2351.58,2470.91 2416.67,2536 U1.109@2416.67,2536.14
  Top Layer w15: v1(2351.58,2470.78) 2380.87,2441.49 ; 2380.9,2441.46 cw(c2322.45,2383.07) 2405.07,2383.07 v1(2405.07,2299.42)
  Bottom Layer w7: C27.2@2397.3,2520.41 C27.2@2397.8,2520.41 ; R23.2@2426.36,2491.85 R23.2@2426.86,2491.85
  Bottom Layer w15: v1(2351.58,2470.78) 2398.2,2517.4 2398.2,2519.52 C27.2@2397.3,2520.41 ; C27.2@2397.8,2520.41 R23.2@2426.36,2491.85 ; v1(2405.07,2299.42) R24.1@2447.12,2257.37
VCC_PE: R26.2 U1.12 U1.29 | length 475.7
  Top Layer w7: U1.29@1815.38,2435.91 v1(1856.26,2395.03) ; U1.12@2004.69,2625.21 v1(2045.57,2584.33)
  Bottom Layer w15: v1(1856.26,2395.03) 1893.45,2395.03 ccw(c1893.45,2451.79) 1933.58,2411.65 2063.57,2541.64 ccw(c2051.22,2553.99) 2063.57,2566.33 v1(2045.57,2584.33) ; R26.2@2016.08,2613.72 v1@2045.46,2584.33
VDD11: C124.2 C125.2 C126.2 C127.2 C128.2 C129.2 C130.2 C131.2 C132.2 C133.2 C134.2 C135.2 C136.2 FB2.2 U13.1 U13.12 U13.18 U13.30 U13.34 U13.45 | length 1286
  Top Layer w10: C131.2@2535.06,1610.89 v1(2567.73,1610.89) U13.18@2676.46,1610.89 ; FB2.2@2762.67,1300.27 C136.2@2818.25,1300.27 ; C136.2@2833.94,1299.58 v1(2833.94,1365) U13.30@2833.94,1433.73 ; v1(2910.91,1365) 2910.91,1302.85 C133.2@2912.68,1301.08 ; v1@2912.68,1365 U13.34@2912.68,1433.73 ; U13.45@3011.11,1650.26 3068.1,1650.26 v1(3069,1651.17)
  Top Layer w15: C131.2@2531.06,1611.73 C127.2@2531.07,1653.3 ; v1(2706.24,1778.03) U13.12@2732.38,1778.03 ; U13.1@2954.46,1755.38 v1(3007.11,1755.38) ; v1@3007.11,1763.06 3007.11,1838.05 cw(c3023.42,1838.05) 3023.42,1854.35 C129.2@3076.51,1854.35
  Bottom Layer w7: C134.2@2910.91,1444.96 cw(c2912.68,1444.96) C134.2@2912.68,1446.72
  Bottom Layer w15: C124.2@2673.72,1805.45 C126.2@2713.61,1805.44 2710.11,1805.44 2708.61,1803.94 2708.61,1800.44 2707.89,1799.72 2707.89,1779.68 v1(2706.24,1778.03) ; v1(2833.94,1365) C130.2@2833.94,1446.72 C134.2@2912.68,1446.72 C132.2@2952.05,1446.72 ; v1(2910.91,1365) C134.2@2910.91,1444.96 ; C128.2@2935,1755.38 v1(3007.11,1755.38) ; C125.2@3011.61,1655.26 3011.61,1650.72 3068.55,1650.72 v1(3069,1651.17)
VDD33: C111.2 C112.2 C113.2 C114.2 C115.2 C116.2 C117.2 C118.2 C119.2 C120.2 C121.2 C122.2 C123.2 FB1.2 U13.7 U13.13 U13.23 U13.25 U13.33 U13.37 U13.40 U13.48 | length 1642.4
  Top Layer w7: U13.37@3011,1490.14 3011,1492.68 U13.37@3011.11,1492.78 ; U13.48@3011.11,1709.32 3066.51,1709.32 3067.51,1710.32 3071.01,1710.32 3076.51,1715.82 C111.2@3076.51,1719.32 C111.2@3076.52,1728.32 ; v1(3037.49,1808.96) cw(c3038.28,1808.96) v1@3038.28,1809.74 ; C119.2@3076.52,1800.74 C119.2@3076.52,1809.74
  Top Layer w9: U13.7@2833.94,1768.37 2833.94,1826.6 cw(c2864.65,1826.6) 2842.94,1848.32 v1(2851.93,1857.31)
  Top Layer w10: C121.2@2531.07,1736.46 v1(2567.73,1736.46) 2666.71,1736.46 cw(c2666.71,1726.71) 2676.46,1726.71 U13.13@2676.46,1709.32 ; v1(2567.73,1512.47) U13.23@2676.46,1512.47 ; C114.2@2870.22,1301.08 2870,1301.3 v1(2870,1365) 2871.98,1365 2882.49,1375.51 ccw(c2857.11,1400.89) 2893,1400.89 U13.33@2893,1433.73 ; U13.40@3011.11,1551.84 3097.16,1551.84 ccw(c3097.16,1611.06) 3138.98,1569.13 ccw(c3097.16,1611.06) v1(3139.04,1569.19)
  Top Layer w15: FB1.2@2531.04,1513.12 2567.08,1513.12 v1(2567.73,1512.47) ; FB1.2@2531.05,1514.58 C123.2@2531.05,1570.15 ; C120.2@2531.07,1694.88 C121.2@2531.07,1736.46 C122.2@2531.06,1778.03 ; C117.2@2706.52,1301.08 v1(2706.52,1365) 2706.52,1418.46 cw(c2721.78,1418.46) 2721.78,1433.73 U13.25@2732.2,1433.73 ; v1(3011,1456) U13.37@3011,1490.14 ; v1@3038.28,1809.74 C119.2@3076.52,1809.74 ; C111.2@3076.51,1719.32 3076.52,1728.32 3076.52,1800.74 C119.2@3076.52,1809.74 ; C119.2@3076.52,1810.74 C119.2@3076.52,1809.74
  Bottom Layer w15: C112.2@2794.31,1755.38 C113.2@2834.2,1755.38 2834.2,1814.61 cw(c2894.49,1814.61) v1(2851.93,1857.31) ; C115.2@3010.11,1591.21 cw(c3010.11,1590.43) 3010.89,1590.43 3010.89,1567.7 ; C116.2@3010.89,1551.84 3010.89,1567.7 ; v1(3011,1456) C116.2@3011,1551.84 ; v1(3139.04,1569.19) 3012.37,1569.19 3010.89,1567.7
VDD-CPU: C37.2 C38.2 C39.2 C40.2 R35.2 R36.1 U1.20 U1.21 U1.25 U1.26 U1.38 U1.47 U1.51 U1.56 | length 1137.1
  Top Layer w7: U1.38@1837.66,2268.89 v1(1878.54,2309.77) ; U1.47@1937.88,2168.67 1971.52,2202.31 cw(c1978.75,2195.12) 1985.97,2202.34 v1(1997.03,2191.27) 2015.51,2172.79 2015.55,2172.75 cw(c2007.8,2165.01) 2015.55,2157.26 U1.51@1982.42,2124.13 ; U1.56@2038.09,2068.46 v1(2078.97,2109.34)
  Bottom Layer w7: R35.2@1837.72,2491.52 R35.2@1842.25,2488.26 ; v1(1873.17,2575.45) v1@1873.3,2575.45
  Bottom Layer w15: v1(1813.48,2515.76) R35.2@1837.72,2491.52 ; R35.2@1842.25,2488.26 C40.2@1901.37,2547.39 ; v1@1873.3,2575.45 C40.2@1897.55,2551.21 ; C39.2@1966.34,2160.77 v1@1996.84,2191.27 ; v1(1997.03,2191.27) 2025.89,2220.13 cw(c2042.39,2203.66) 2058.87,2220.14 2058.92,2220.1 2115.73,2163.28 2115.86,2163.16 ; v1@2080.19,2109.34 2115.86,2145.01 2140.75,2169.9 2141.49,2170.63 ; 2108.36,2137.55 ccw(c2091.81,2154.1) 2108.36,2170.65 ; 2108.4,2170.62 ccw(c2124.95,2187.17) 2141.5,2170.62 ; v1(2355.94,2224.84) 2295.79,2284.99 2295.75,2285.04 ccw(c2275.82,2265.11) 2255.88,2285.03 2141.49,2170.63 ; v1@2357.14,2224.34 R36.1@2386.42,2195.06
VDD-PHY: R36.2 U1.88 | length 230.8
  Top Layer w7: U1.88@2442.82,2253.88 U1.88@2461.22,2235.48 2499.91,2196.79 2499.91,2154.45 2482.38,2136.93 v1(2444.43,2136.93)
  Bottom Layer w15: R36.2@2412.59,2168.77 v1(2444.43,2136.93)
VDD-SYS: C33.2 C34.2 C35.2 C36.2 R34.2 R35.1 U1.19 U1.58 U1.64 U1.80 U1.108 U1.126 | length 1398.5
  Top Layer w7: U1.19@1926.74,2547.26 v1(1967.62,2506.38) ; U1.58@2060.36,2046.18 v1(2119.24,2105.06) ; v1(2086.3,1938.48) U1.64@2127.18,1979.36 ; v1(2186.5,2684.55) U1.126@2227.38,2725.43 2290.45,2788.5 C33.2@2293.94,2788.5 ; v1(2328.99,2200.68) 2332.17,2186.37 U1.80@2372.15,2146.4 ; v1(2405.22,2465.83) 2391.82,2479.23 cw(c2396.7,2484.11) 2391.82,2488.98 U1.108@2427.82,2524.99
  Top Layer w15: v1(1967.62,2506.38) 2008.33,2506.38 v1(2186.5,2684.55) ; v1(2119.24,2105.06) 2215.22,2201.04 cw(c2271.22,2145.04) 2271.22,2224.24 2272.13,2224.24 cw(c2272.13,2143.82) 2319.35,2208.91 cw(c2272.13,2143.82) v1(2328.99,2200.68)
  Bottom Layer w7: R34.2@2112,2797.94 2119.77,2797.94 R34.2@2122.25,2795.47
  Bottom Layer w15: R35.1@1868.41,2462.1 1882.82,2447.69 ccw(c1895.16,2459.93) 1895.16,2442.55 ccw(c1895.16,2463.37) 1909.9,2448.67 v1(1967.62,2506.38) ; R34.2@2122.25,2795.47 C34.2@2179.37,2738.35 2169.22,2728.2 ccw(c2182.41,2715.02) 2169.22,2701.83 v1(2186.5,2684.55) ; v1(2328.99,2200.68) 2328.99,2198.35 2358.29,2169.05 2358.29,2167.93 C35.2@2354.46,2164.09
VIN+: C152.2 C153.2 D14.2 J10.1 J10.2 R125.1 U19.2 U20.2 U20.3 | length 2091.2
  Top Layer w35: 451.37,4233.87 cw(c504.57,4233.87) 504.57,4287.07 1801.91,4287.07 ccw(c1801.91,4345.15) 1860,4345.15 1860,4610.27 ccw(c1808.16,4610.27) 1808.16,4662.1 C153.2@1619.17,4662.1 ; J10.2@548.67,4340.26 ccw(c601.86,4340.26) 601.86,4287.07
VLED+: C98.2 J4.2 U12.3 | length 628.8
  Top Layer w12: J4.2@52.95,2037.4 171.09,2037.4 cw(c171.09,2014.65) 193.83,2014.65 193.83,1940.19 ccw(c215.17,1940.19) 215.17,1918.85 v1(409.42,1918.85)
  Top Layer w20: v1(409.42,1918.85) v1(439.14,1918.85)
  Bottom Layer w17: C98.2@487.5,1918.85 U12.3@552.4,1918.85
  Bottom Layer w25: v1(409.42,1918.85) v1(439.14,1918.85) C98.2@487.5,1918.85
VLED-: J4.1 R84.2 R86.2 | length 351.8
  Bottom Layer w7: R84.2@432.39,1989.5 R84.2@439.14,1996.25
  Bottom Layer w17: R84.2@432.39,1989.5 R84.2@439.14,1989.5 ; R84.2@432.64,2003.3 439.14,2009.8 439.14,2024.12
  Bottom Layer w20: v1@150.93,2003.3 R84.2@432.64,2003.3 ; v1(151.33,1972.56) v1(151.33,2002.89)
VRA1: C22.2 U1.117 | length 88.2
  Top Layer w7: U1.117@2327.6,2625.21 2388.13,2685.75 C22.2@2386.3,2687.58
VRA2: C21.2 R31.2 U1.118 | length 146.9
  Top Layer w7: U1.118@2316.48,2636.34 2349.28,2669.14 ccw(c2333.95,2684.46) 2355.62,2684.46 2355.62,2710.46 2355.85,2710.68 2355.85,2718.46 C21.2@2353.37,2720.93 ; R31.2@2323.84,2750.17 R31.2@2324.14,2750.17
  Top Layer w15: R31.2@2320.14,2754.17 C21.2@2352.37,2721.93
VSD: D1.2 J1.4 R2.2 R3.2 R4.2 R5.2 R6.2 R7.2 R8.1 | length 923.2
  Top Layer w12: D1.2@3724.32,2402.53 v1(3724.32,2364.12) 3724.32,2242.26 ccw(c3742.64,2242.26) 3742.64,2223.94 3898.85,2223.94 ccw(c3898.85,2239.36) 3914.27,2239.36 J1.4@3914.27,2303.35
  Bottom Layer w12: v1(3724.32,2364.12) R8.1@3724.32,2439.71 R5.2@3776.27,2439.71 R3.2@4034.52,2439.71 R7.2@4138.5,2439.71
W_DIS: pad.2@2944.88,2893.39 U14.4 | length 108.6
  Top Layer w15: pad.2@2944.88,2893.39 U14.4@2944.88,3001.97
WAKEUP: pad.2@2791.34,2893.39 U14.1 | length 108.6
  Top Layer w15: pad.2@2791.34,2893.39 U14.1@2791.34,3001.97
X24MIN: C1.2 U1.75 X1.1 | length 207.6
  Top Layer w7: U1.75@2316.48,2090.73 2386.03,2021.18 ccw(c2420.51,2055.66) X1.1@2420.51,2006.9 ; X1.1@2432.16,2014.92 X1.1@2454.5,2014.92
  Top Layer w10: X1.1@2454.5,2014.92 C1.2@2488.89,2049.3
X24MOUT: C2.2 U1.74 X1.3 | length 287.2
  Top Layer w7: U1.74@2305.33,2079.59 2405.91,1979 cw(c2369.45,1942.54) 2421.02,1942.92 2421.02,1913.06 cw(c2411.52,1913.06) X1.3@2418.24,1906.35 X1.3@2396.77,1906.35
  Top Layer w10: C2.2@2364.2,1873.78 X1.3@2396.77,1906.35
X32KIN: C5.2 R122.1 U1.96 X2.1 | length 280.7
  Top Layer w7: U1.96@2550.32,2324.57 2583.74,2358 cw(c2591.36,2350.39) 2598.97,2358 R122.1@2664,2292.97 2670.68,2286.93 2690.59,2267.02 ccw(c2698.22,2274.65) 2705.86,2267.02 X2.1@2720.73,2281.89
  Top Layer w10: X2.1@2726.01,2286.72 C5.2@2760.96,2321.67
X32KOUT: C6.2 R122.2 U1.95 X2.2 | length 261.8
  Top Layer w7: U1.95@2539.18,2313.43 2604.54,2248.07 ccw(c2611.82,2255.35) 2619.1,2248.07 R122.2@2637.83,2266.81 ; X2.2@2639.85,2200.68 X2.2@2662.74,2200.68 ; R122.2@2643.88,2260.12 2663.79,2240.21 cw(c2656.16,2232.58) 2663.79,2224.95 X2.2@2648.92,2210.08
  Top Layer w10: C6.2@2613.22,2174.06 X2.2@2639.85,2200.68
pads on no net: J3.4 J4.35 J4.41 J4.42 J4.43 J4.44 J4.45 J4.46 J4.47 J4.48 LS1.3 U1.81 U1.82 U1.83 U1.84 U1.86 U1.87 U1.113 U1.114 U1.119 U1.120 U1.121 U1.124 U1.125 U3.7 U4.7 U4.8 U4.9 U4.10 U4.11 U4.12 U4.13 U4.14 U4.15 U8.9 U13.16 U13.17 U13.19 U13.20 U13.28 U13.29 U13.31 U13.32 U13.43 U13.44 U13.46 U13.47 U14.3 U14.18 U14.23 U14.24 U14.25 U14.26 U14.27 U14.28 U14.29 U14.30 U14.31 U14.32 U14.33 U14.37 U14.38 U14.39 U14.40 U14.41 U14.42 U14.43 U14.44 U14.45 U14.55 U14.113 U14.114 U14.116 U14.117 U14.118 U14.119 U14.120 U14.121 U14.122 U14.123 U14.124 U14.125 U14.126 U14.127 U14.129 U14.130 U14.131 U14.132 U14.133 U14.134 U14.135 U14.136 U14.137 U14.138 U14.139 U14.140 U14.141 U14.142 U14.143 U14.144 U15.1 U15.20 U19.5 U19.8